# Altium PCB PCB1.PcbDoc
Units mm, origin at the board's own origin, x right, y up, seen from the top; angles counter-clockwise.
Board outline 145.29 x 144.91 mm, 2 copper layers (Top Layer, Bottom Layer); 41 components, 36 nets, 219 pads, 0 vias.
Unrouted connection lines stored in the file: 1.
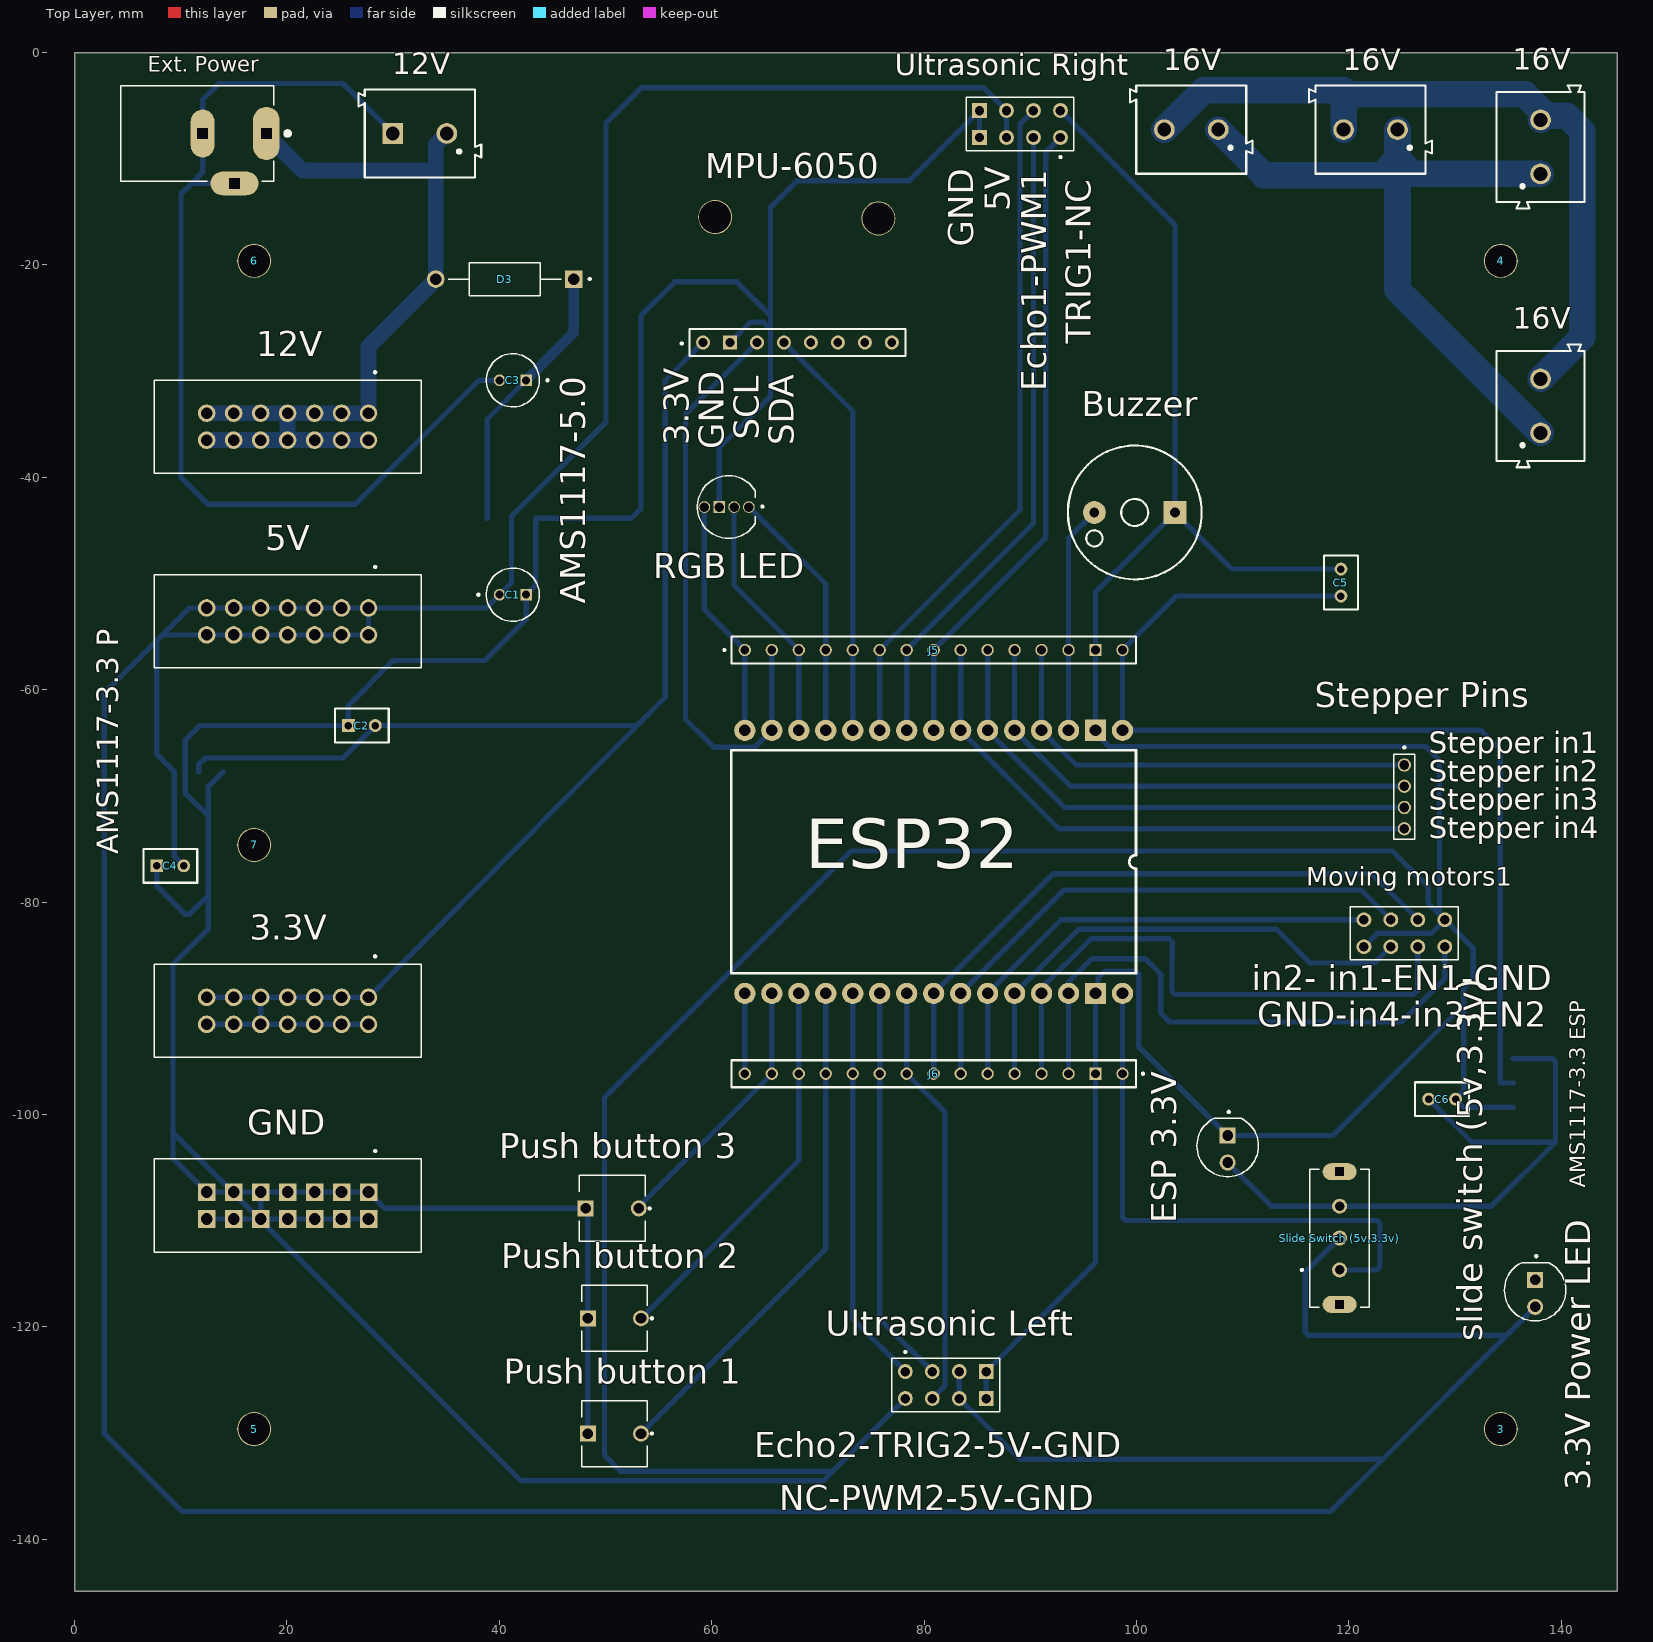
[diagram p0: Top Layer view]
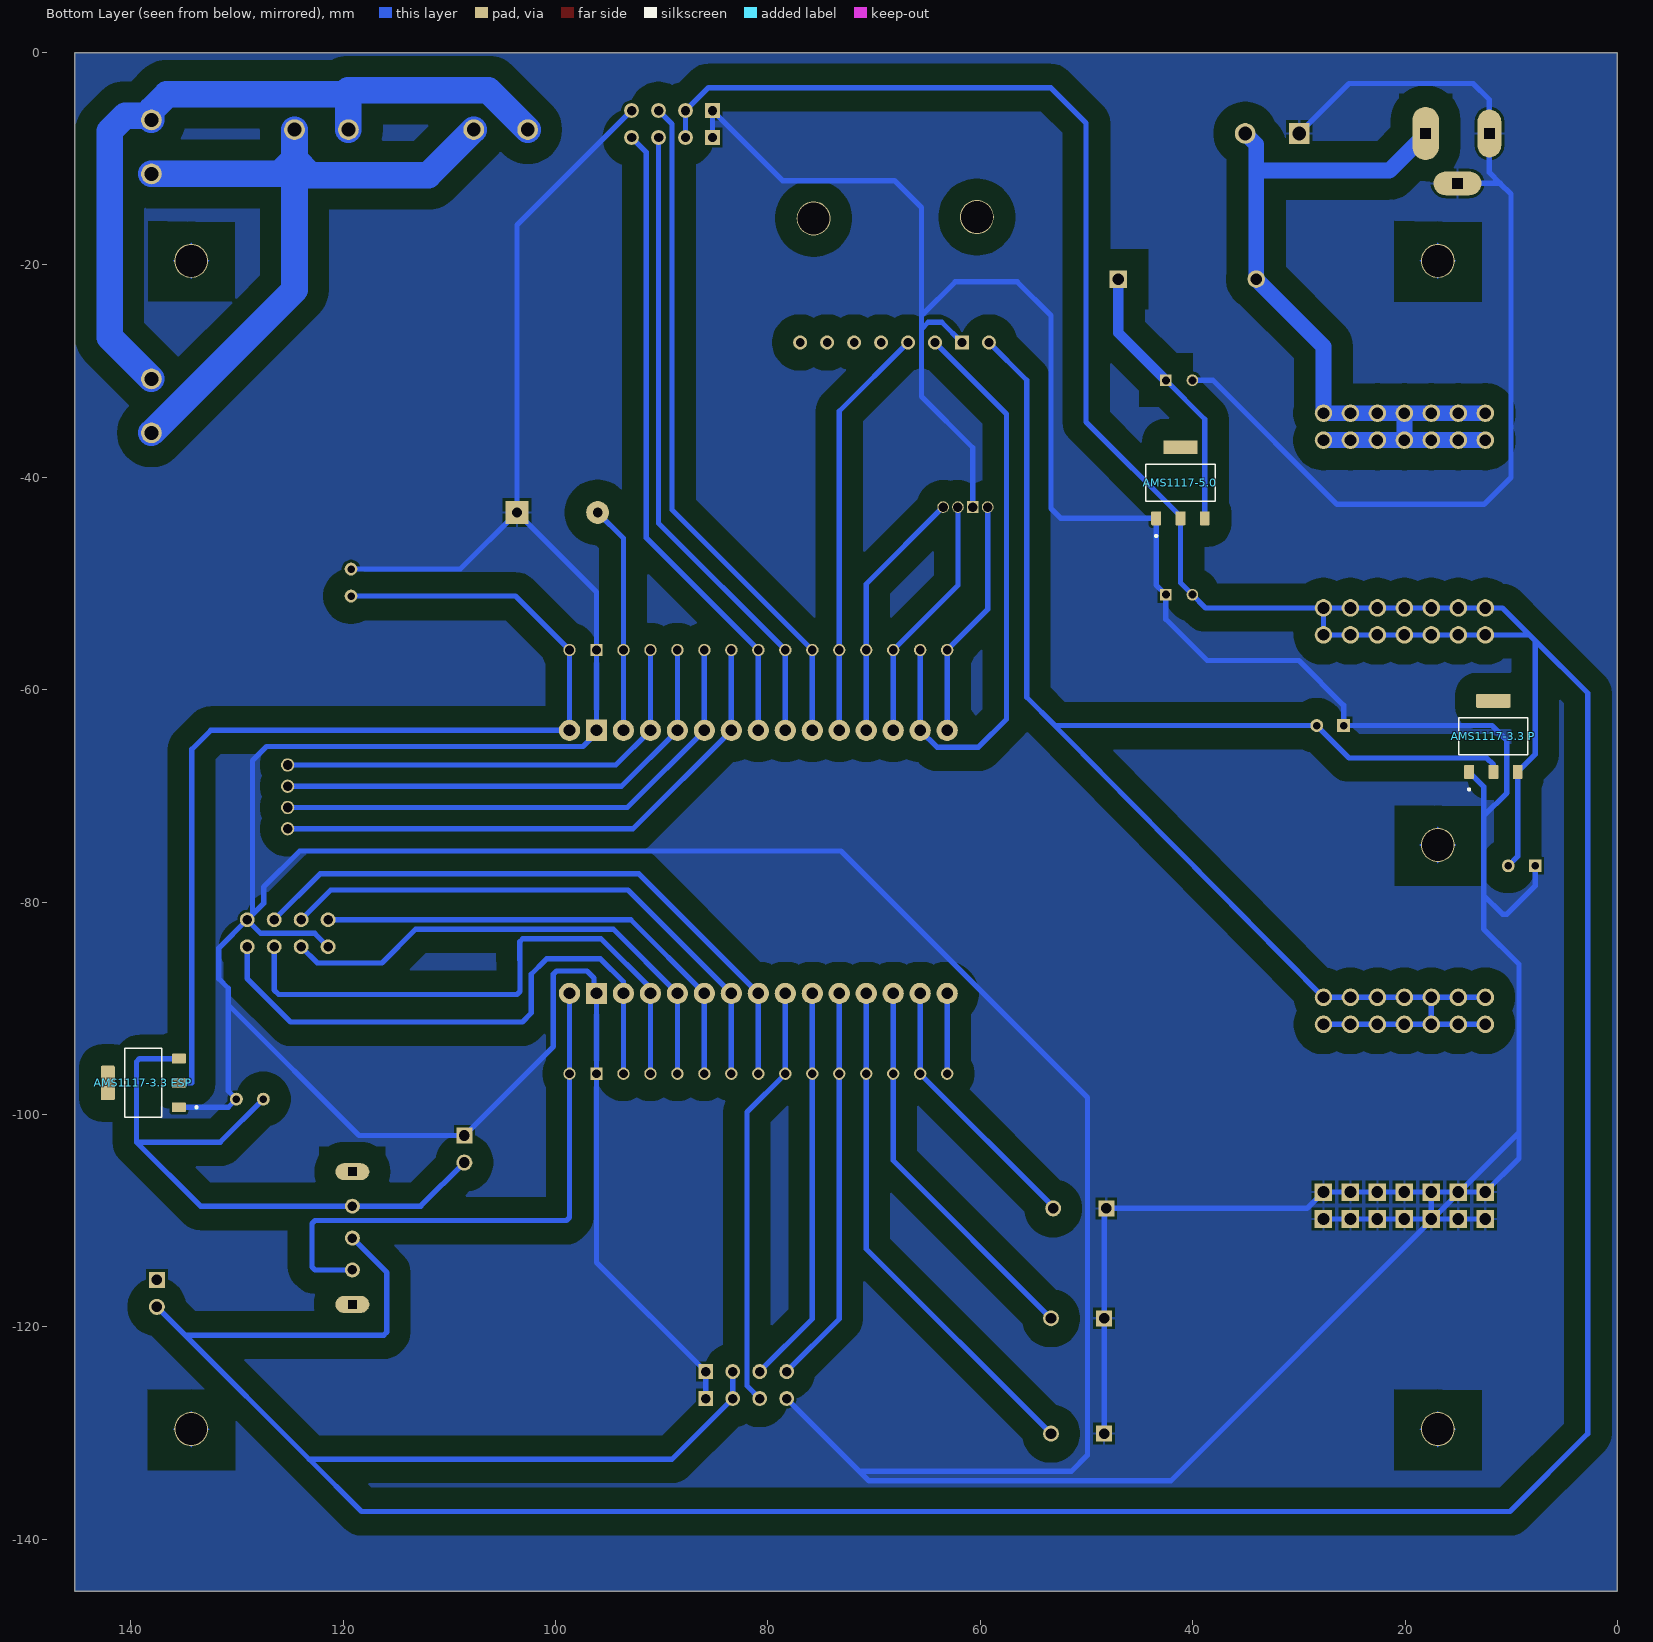
[diagram p1: Bottom Layer view, seen from below]
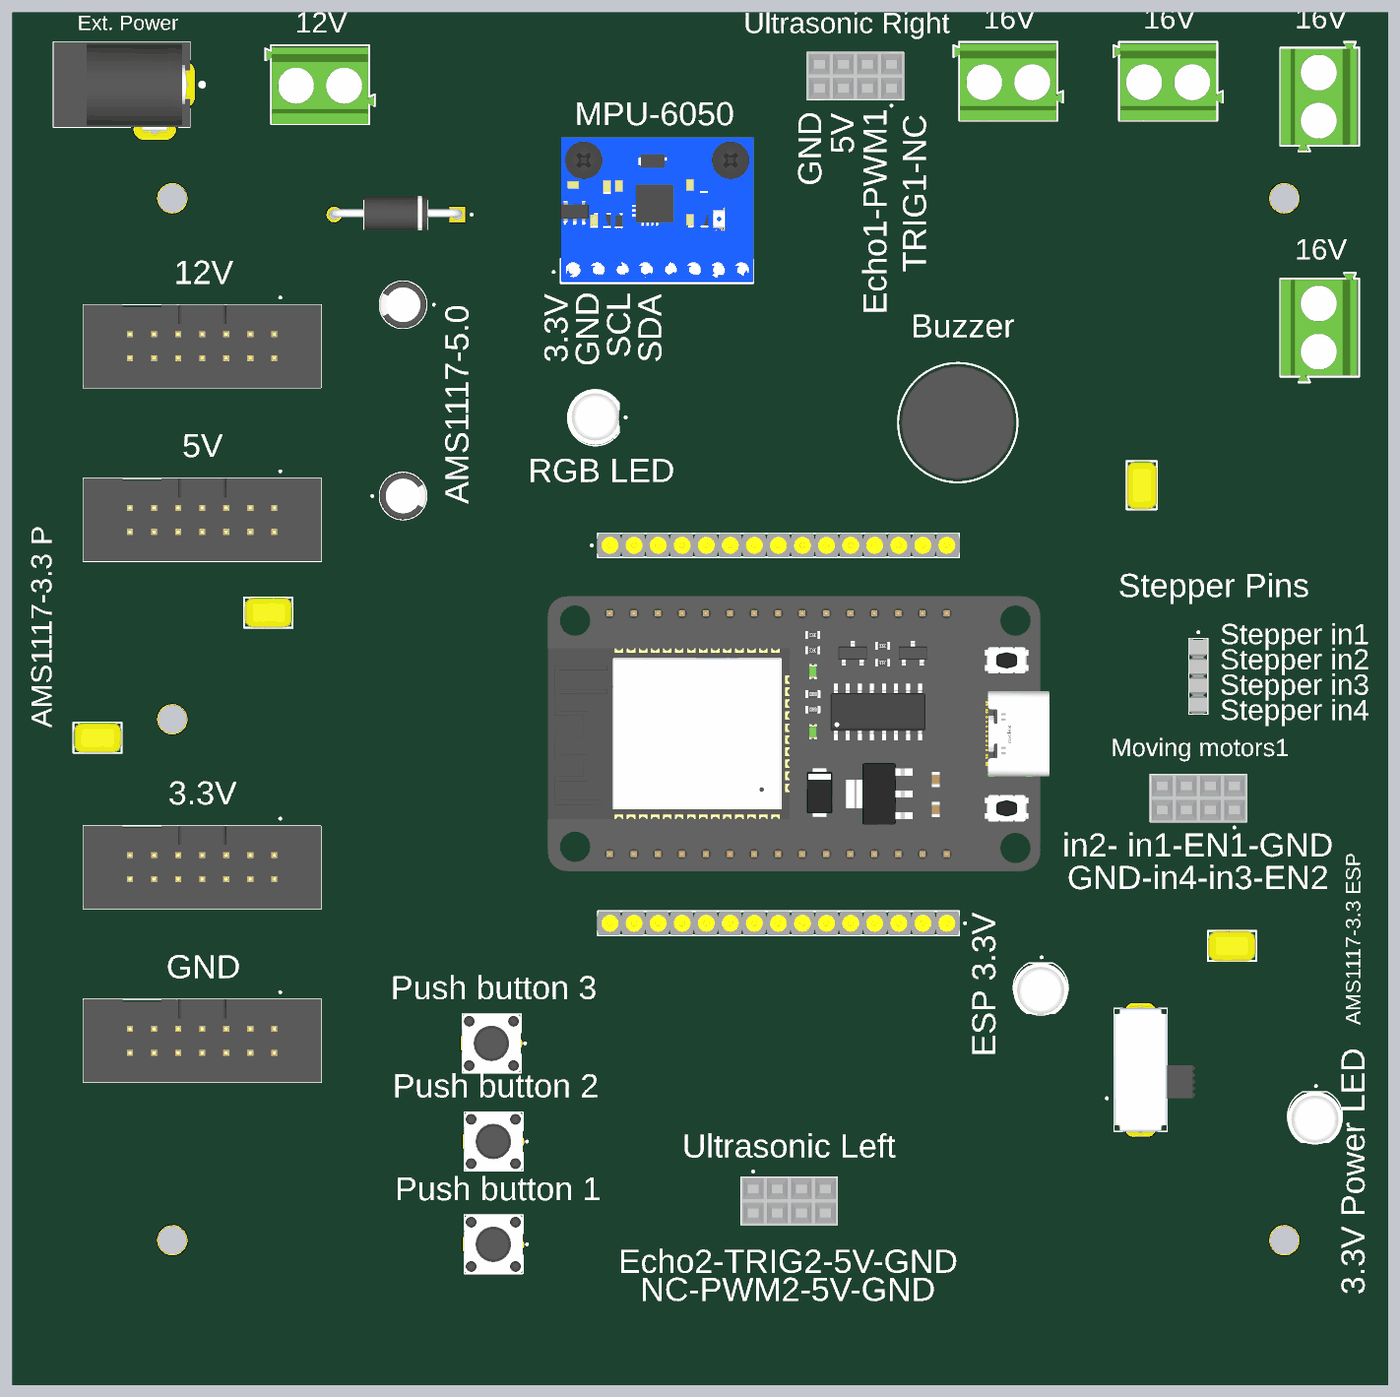
[diagram p2: 3D render of the assembled board from above, using the file's embedded part models]
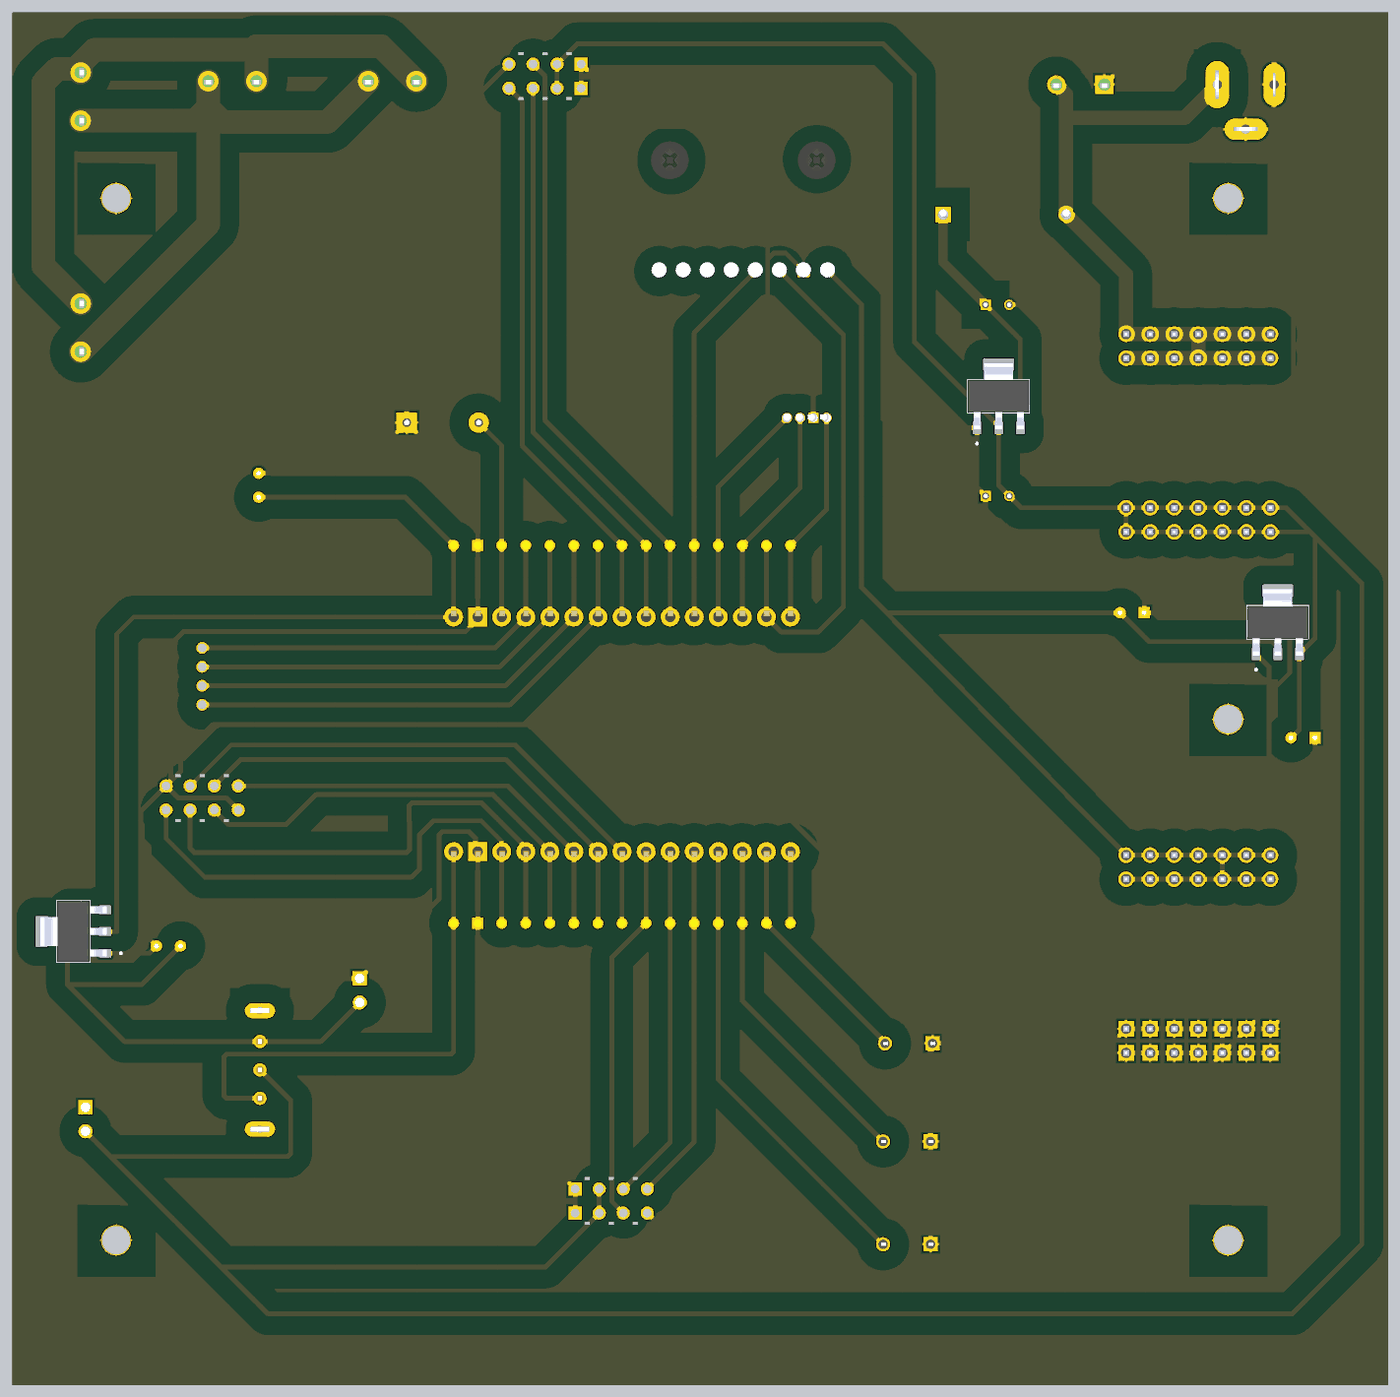
[diagram p3: 3D render of the assembled board from below, using the file's embedded part models]

## Layer stack, top to bottom
Top Solder: solder mask 0.0102, Solder Resist, Dk 3.5
Top Layer: signal copper 0.0356
Dielectric 1: dielectric 0.32, FR-4, Dk 4.8
Bottom Layer: signal copper 0.0356
Bottom Solder: solder mask 0.0102, Solder Resist, Dk 3.5

## Board outline
0,-144.907 145.288,-144.907 145.288,0 0,0

## Design rules (kind name [scope] priority, off if disabled: settings)
Clearance [All] p1: gap=0.254 ignorepadtopadclearanceinfootprint=FALSE except(0: Arc-Hole Track-Hole SMDPad-Hole THPad-Hole Via-Hole Fill-Hole Poly-Hole Region-Hole Text-Hole; 2: Arc-Poly Track-Poly SMDPad-Poly THPad-Poly)
PolygonConnect [All] p1: connectstyle=Relief reliefconductorwidth=0.254 reliefentries=4 polygonreliefangle="90 Angle" airgapwidth=0.254
RoutingLayers [All] p1: top layer_v5=FALSE bottom layer_v5=TRUE
RoutingVias [All] p1: holewidth=0.711 width=1.27 viastyle="Through Hole" minholewidth=0.711 minwidth=1.27 maxholewidth=0.711 maxwidth=1.27
SolderMaskExpansion [All] p1: expansion=0.102 istentingtop=FALSE
Width [All] p1: maxlimit=2.5 minlimit=0.254 preferedwidth=0.5
29 further rules are at their usual default settings.

## Components (designator, comment, footprint, x,y, rotation, side; value= is the part's Value field where it differs from the comment)
3 "Mounting Hole" PCBComponent_1 134.304,-129.619 r90 top
3.3V "3.3v pin headers block" AMPHENOL_52601-S14-4LF#1 20.066,-90.235 r180 top
"3.3V Power LED" "LED 5mm" "LED 5mm" 137.541,-116.84 r270 top
4 "Mounting Hole" PCBComponent_1 134.304,-19.619 r90 top
5 "Mounting Hole" PCBComponent_1 16.916,-129.619 r90 top
5V "5v pin headers block" AMPHENOL_52601-S14-4LF#1 20.066,-53.568 r180 top
6 "Mounting Hole" PCBComponent_1 16.916,-19.619 r90 top
7 "Mounting Hole" PCBComponent_1 16.916,-74.619 r90 top
12V "12v pin headers block" AMPHENOL_52601-S14-4LF#1 20.066,-35.235 r180 top
12V "From Buck" 691213510002#1 32.512,-7.62 r180 top
16V "From Buck" 691213510002#2 138.049,-8.89 r90 top
16V "From Buck" 691213510002#2 138.049,-33.274 r90 top
16V "From Buck" 691213510002#2 122.036,-7.26 r180 top
16V "From Buck" 691213510002#2 105.156,-7.26 r180 top
"AMS1117-3.3 ESP" "AMS1117-3.3" SOT229P700X180-4N 138.811,-97.028 r0 bottom
"AMS1117-3.3 P" "AMS1117-3.3" SOT229P700X180-4N 11.684,-64.389 r90 bottom
AMS1117-5.0 "AMS1117-5.0" SOT229P700X180-4N 41.148,-40.513 r90 bottom
Buzzer "Buzzer" "Buzzer 5V" 99.832,-43.307 r180 top
C1 "CAP  33UF 50V RADIAL" "CAP  33UF 50V RADIAL"#1 41.275,-51.054 r0 top
C2 "Ceramic Capacitor 100nF" C320C#1 34.051,-56.373 r0 top
C3 "CAP  33UF 50V RADIAL" "CAP  33UF 50V RADIAL"#2 41.275,-30.861 r180 top
C4 "Ceramic Capacitor 100nF" C320C#1 16.017,-69.581 r0 top
C5 "Ceramic Capacitor 100nF" C320C#2 126.253,-56.911 r270 top
C6 "Ceramic Capacitor 100nF" C320C#2 121.778,-105.552 r180 top
D3 "RL207" DIOAD1300W80L670D310 40.513,-21.336 r180 top
ESP32 "ESP32DEVKITV1" ESP32DEVKITV1 81.026,-75.508 r90 top
"ESP 3.3V" "LED 5mm" "LED 5mm" 108.585,-103.251 r270 top
"Ext. Power" "DC Power Jack Female Socket" "DC Power Jack Female Socket" 18.065,-7.62 r180 top
GND "GND pin headers block" AMPHENOL_52601-S14-4LF#2 20.066,-108.568 r180 top
J5 "TS-115-T-A-1" SAMTEC_TS-115-T-A-1#1 80.899,-56.261 r0 top
J6 "TS-115-T-A-1" SAMTEC_TS-115-T-A-1#2 80.899,-96.157 r180 top
"Moving motors1" "Pin header female block 8 pin" "Pin header female block 8 pin"#1 125.222,-82.931 r180 top
MPU-6050 "MPU-6050" MPU-6050 57.658,-28.829 r90 top
"Push button 1" "FSM8JRT" TE_FSM8JRT 53.34,-130.048 r180 top
"Push button 2" "FSM8JRT" TE_FSM8JRT 53.34,-119.189 r180 top
"Push button 3" "FSM8JRT" TE_FSM8JRT 53.137,-108.839 r180 top
"RGB LED" "common cathode" "LED RGB 5mm" 61.595,-42.799 r180 top
"Slide Switch (5v,3.3v)" "slide switch (5v,3.3v)" "Slide switch" 119.126,-111.633 r90 top
"Stepper Pins" "Pin hreader 4 pins" "Pin hreader 4 pins" 125.222,-67.088 r270 top
"Ultrasonic Left" "Pin header female block 8 pin" "Pin header female block 8 pin"#2 82.042,-125.476 r0 top
"Ultrasonic Right" "Pin header female block 8 pin" "Pin header female block 8 pin"#2 89.027,-6.731 r180 top

## Footprints (in the part's own frame and the unit in brackets; to place one, negate y for a bottom-side part, rotate by r counter-clockwise, add the part's x,y. Pads: shape width x height; smd on the part's side, far side on the other; paste and mask are expansions set on the pad)
691213510002#1 [mm]
  round 1.95 hole 1.3: 1(-2.54,0)
  rect 1.95x1.95 hole 1.3: 2(2.54,0)
  silkscreen extent -5.78,-4.15 5.78,4.15, body extent -5.68,-3.94 5.68,4.16, height 10
691213510002#2 [mm]
  round 1.95 hole 1.3: 1(-2.54,0) 2(2.54,0)
  silkscreen extent -5.78,-4.15 5.78,4.15, body extent -5.68,-3.94 5.68,4.16, height 10
AMPHENOL_52601-S14-4LF#1 [mm]
  round 1.65 hole 1.1: 1(-7.62,-1.27) 2(-7.62,1.27) 3(-5.08,-1.27) 4(-5.08,1.27) 5(-2.54,-1.27) 6(-2.54,1.27) 7(0,-1.27) 8(0,1.27) 9(2.54,-1.27) 10(2.54,1.27) 11(5.08,-1.27) 12(5.08,1.27) 13(7.62,-1.27) 14(7.62,1.27)
  silkscreen extent -12.57,-5.23 12.57,4.38, body extent -12.57,-4.38 12.57,4.38, height 9.53
AMPHENOL_52601-S14-4LF#2 [mm]
  rect 1.65x1.65 hole 1.1: 1(-7.62,-1.27) 2(-7.62,1.27) 3(-5.08,-1.27) 4(-5.08,1.27) 5(-2.54,-1.27) 6(-2.54,1.27) 7(0,-1.27) 8(0,1.27) 9(2.54,-1.27) 10(2.54,1.27) 11(5.08,-1.27) 12(5.08,1.27) 13(7.62,-1.27) 14(7.62,1.27)
  silkscreen extent -12.57,-5.23 12.57,4.38, body extent -12.57,-4.38 12.57,4.38, height 9.53
"Buzzer 5V" [mil]
  rect 85x85 hole 36: NEG(-149.61,0)
  round 85 hole 36: POS(149.61,0)
  silkscreen extent -248,-248 248,248, body extent -236,-236 236,236, height 394
C320C#1 [mm]
  rect 1.21x1.21 hole 0.71: 1(-8.27,-7)
  round 1.21 hole 0.71: 2(-5.73,-7)
  silkscreen extent -9.54,-8.59 -4.46,-5.41, body extent -9.53,-8.57 -4.45,-5.4, height 7.1
C320C#2 [mm]
  round 1.21 hole 0.71: 1(-8.27,-7) 2(-5.73,-7)
  silkscreen extent -9.54,-8.59 -4.46,-5.41, body extent -9.52,-8.57 -4.45,-5.4, height 7.1
"CAP  33UF 50V RADIAL"#1 [mm]
  rect 1.1x1.1 hole 0.75: N(1.25,0)
  round 1.1 hole 0.75: P(-1.25,0)
  silkscreen extent -3.35,-2.5 2.5,2.5, body extent -2.49,-2.5 2.5,2.5, height 11
"CAP  33UF 50V RADIAL"#2 [mm]
  round 1.1 hole 0.75: N(1.25,0)
  rect 1.1x1.1 hole 0.75: P(-1.25,0)
  silkscreen extent -3.35,-2.5 2.5,2.5, body extent -2.49,-2.5 2.5,2.5, height 11
"DC Power Jack Female Socket" [mm]
  oval 2.5x5 hole 1 square: 1(0,0)
  oval 2.25x4.5 hole 1 square: 2(6,0)
  oval 4.5x2.25 hole 1 square: 3(3,4.7)
  silkscreen extent -2.2,-4.5 13.7,4.5, body extent -0.7,-4.5 13.7,4.9, height 11
DIOAD1300W80L670D310 [mm]
  round 1.65 hole 1.1: A(6.5,0)
  rect 1.65x1.65 hole 1.1: C(-6.5,0)
  silkscreen extent -8.1,-1.55 5.32,1.55, body extent -6.9,-1.95 6.9,1.65, height 3.6
ESP32DEVKITV1 [mm]
  round 2 hole 1.1: 1(11.684,-17.653) 3(11.684,-12.573) 4(11.684,-10.033) 5(11.684,-7.493) 6(11.684,-4.953) 7(11.684,-2.413) 8(11.684,0.127) 9(11.684,2.667) 10(11.684,5.207) 11(11.684,7.747) 12(11.684,10.287) 13(11.684,12.827) 14(11.684,15.367) 15(11.684,17.907) 16(-13.086,17.907) 17(-13.086,15.367) 18(-13.086,12.827) 19(-13.086,10.287) 20(-13.086,7.747) 21(-13.086,5.207) 22(-13.086,2.667) 23(-13.086,0.127) 24(-13.086,-2.413) 25(-13.086,-4.953) 26(-13.086,-7.493) 27(-13.086,-10.033) 28(-13.086,-12.573) 30(-13.086,-17.653)
  rect 2x2 hole 1.1: 2(11.684,-15.113) 29(-13.086,-15.113)
  silkscreen extent -11.2,-18.92 9.79,19.18, body extent -15.13,-28.49 13.86,24.48, height 8.36
"LED 5mm" [mm]
  round 1.508 hole 1: A(1.27,0)
  rect 1.508x1.508 hole 1: C(-1.27,0)
  silkscreen extent -3.6,-2.9 2.6,2.9, body extent -2.88,-2.9 2.51,2.9, height 12.1
"LED RGB 5mm" [mm]
  round 1.1 hole 0.9: 1(-1.905,0) 2(-0.508,0) 4(2.286,0)
  rect 1.1x1.1 hole 0.9: 3(0.889,0)
  silkscreen extent -3.27,-2.95 2.95,2.95, body extent -2.47,-3.05 2.98,2.84, height 9.6
MPU-6050 [mil]
  round 52 hole 32: 01(60,-60) 03(60,-260) 04(60,-360) 05(60,-460) 06(60,-560) 07(60,-660) 08(60,-760)
  rect 52x52 hole 32: 02(60,-160)
  round 125.98 hole 118.11: ""(520,-710) ""(525,-105)
  silkscreen extent 10,-810 110,23, body extent 15,-811 615,-9, height 612
PCBComponent_1 [mm]
  round 3.2 hole 3: ""(0,0)
  Bottom Layer lines w0.15: 0,1.649 0,-1.651 ; -1.651,0 1.649,0
"Pin header female block 8 pin"#1 [mm]
  round 1.398 hole 0.89: 1(-3.81,1.27) 2(-1.27,1.27) 3(1.27,1.27) 4(3.81,1.27) 5(-3.81,-1.27) 6(-1.27,-1.27) 7(1.27,-1.27) 8(3.81,-1.27)
  silkscreen extent -5.08,-2.52 5.08,3.21, body extent -5.08,-2.51 5.08,2.51, height 6.22
"Pin header female block 8 pin"#2 [mm]
  round 1.398 hole 0.89: 1(-3.81,1.27) 2(-1.27,1.27) 3(1.27,1.27) 5(-3.81,-1.27) 6(-1.27,-1.27) 7(1.27,-1.27)
  rect 1.398x1.398 hole 0.89: 4(3.81,1.27) 8(3.81,-1.27)
  silkscreen extent -5.08,-2.52 5.08,3.21, body extent -5.08,-2.51 5.08,2.51, height 6.22
"Pin hreader 4 pins" [mm]
  round 1.25 hole 0.9: 1(0,0) 2(2,0) 3(4,0) 4(6,0)
  silkscreen extent -1.75,-1 7,1, body extent -1.01,-1.02 6.98,0.98, height 5.78
SAMTEC_TS-115-T-A-1#1 [mil]
  round 45.78 hole 32: 01(-700,0) 02(-600,0) 03(-500,0) 04(-400,0) 05(-300,0) 06(-200,0) 07(-100,0) 08(0,0) 09(100,0) 10(200,0) 11(300,0) 12(400,0) 13(500,0) 15(700,0)
  rect 45.78x45.78 hole 32: 14(600,0)
  silkscreen extent -780,-50 750,50, body extent -754,-50 754,50, height 326
SAMTEC_TS-115-T-A-1#2 [mil]
  round 45.78 hole 32: 01(-700,0) 03(-500,0) 04(-400,0) 05(-300,0) 06(-200,0) 07(-100,0) 08(0,0) 09(100,0) 10(200,0) 11(300,0) 12(400,0) 13(500,0) 14(600,0) 15(700,0)
  rect 45.78x45.78 hole 32: 02(-600,0)
  silkscreen extent -780,-50 750,50, body extent -754,-50 754,50, height 326
"Slide switch" [mm]
  round 1.408 hole 0.9: 1(-3,0) 2(0,0) 3(3,0)
  oval 1.6x3.2 hole 0.8 square: SH1(-6.25,0) SH2(6.25,0)
  silkscreen extent -6.5,-2.8 6.5,3.66, body extent -6.5,-5.8 6.5,2.8, height 6
SOT229P700X180-4N [mm]
  rrect15% 1.31x0.93 smd: 1(-3.345,2.29) 2(-3.345,0) 3(-3.345,-2.29)
  rrect15% 1.31x3.24 smd: 4(3.345,0)
  silkscreen extent -5.1,-3.25 1.75,3.25, body extent -3.5,-3.25 3.5,3.25, height 1.8
TE_FSM8JRT [mil]
  round 59 hole 39: 1(0,0)
  rect 59x59 hole 39: 2(197,0)
  silkscreen extent -44,-122 221,122, body extent -22,-122 222,122, height 372

## Part data
3.3V 5V 12V GND: library part 52601-S14-4LF, Package=None, Availability=Unavailable, MF="{'manufacturer': u'Amphenol ICC (FCI)'}", MP=52601-S14-4LF, Price=None
"3.3V Power LED" "ESP 3.3V": "Red 623nm LED Indication - Discrete 1.9V Radial", Package=None, Availability=Unavailable, MF="{'manufacturer': u'Wurth Elektronik'}", MP=151054RS03000, Price=None
12V 16V 16V 16V 16V: library part "Terminal Block", "2 Position Wire to Board Terminal Block Horizontal with Board 0.200 (5.08mm) Through Hole", Package=None, Check_prices=https://www.snapeda.com/parts/691213510002/Wurth+Electronics/view-part/?ref=eda, MF="Wurth Electronics", MP=691213510002, SnapEDA_Link=https://www.snapeda.com/parts/691213510002/Wurth+Electronics/view-part/?ref=snap
"AMS1117-3.3 ESP" "AMS1117-3.3 P" AMS1117-5.0 J5 J6 "Moving motors1" "Stepper Pins" "Ultrasonic Left" "Ultrasonic Right": Package=None, Availability=Unavailable, Price=None
  "AMS1117-3.3 ESP" "AMS1117-3.3 P": MF="{'manufacturer': u'Advanced Monolithic Systems'}", MP=AMS1117-3.3
  AMS1117-5.0: MF="{'manufacturer': u'Advanced Monolithic Systems'}", MP=AMS1117-5.0
  J5 J6: MF="{'manufacturer': u'Samtec'}", MP=TS-115-T-A-1
  "Moving motors1" "Ultrasonic Left" "Ultrasonic Right": MF="{'manufacturer': u'TE Connectivity'}", MP=5-534998-4
  "Stepper Pins": MF="{'manufacturer': u'TE Connectivity'}", MP=2355181-4
Buzzer: library part "Buzzer 5V", "BUZZER 2.3KHZ 4-6VDC", Package=None, Availability=Unavailable, MF="{'manufacturer': u'Soberton Inc.'}", MP=WST-1205S, Price=None
C1 C3: "NHG-A", Package=None, Availability=Unavailable, MF="{'manufacturer': u'Panasonic'}", MP=ECA1HHG330I, Price=None
C2 C4 C5 C6: "0.1ÂµF Â±20% 50V Ceramic Capacitor Z5U Radial", Package="Radial KEMET", Availability=Unavailable, MF=KEMET, MP=C320C104M5U5TA, Price=None, SnapEDA_Link=https://www.snapeda.com/parts/C320C104M5U5TA/KEMET/view-part/228184/?ref=snap
D3: "Semiconductors and Actives, Power Diodes, Discretes (diodes, transistors, thyristors ...), Diodes", Package=None, Availability=Unavailable, MF="{'manufacturer': u'Diodes Inc.'}", MP=RL207, Price=None
"Ext. Power": "2.0 mm Center Pin, 2.5 A, Right Angle, Through Hole, Dc Power Jack Connector", Package=None, Availability=Unavailable, MF="{'manufacturer': u'CUI Devices'}", MP=PJ-002A, Price=None
"Push button 1" "Push button 2" "Push button 3": "Tactile Switches PUSHBUTTON SWITCH TACT", Package=None, Availability=Unavailable, MF="{'manufacturer': u'TE Connectivity'}", MP=FSM8JRT, Price=None
"RGB LED": library part "LED RGB 5mm", Package=None, Availability=Unavailable, MF="{'manufacturer': u'Kingbright'}", MP=WP154A4SUREQBFZGC, Price=None
"Slide Switch (5v,3.3v)": library part "Slide switch", Package=None, Availability=Unavailable, MF="{'manufacturer': u'E-Switch'}", MP=EG1206, Price=None

## Nets (pads, with @x,y where several pads share a name; then routed paths per layer and width w, separated by ;. In a path a pad name is that pad's centre, name@x,y a point inside that pad or via, vN(x,y) a via of type N, cw(c..) or ccw(c..) an arc to the next point about the centre after c; other vN are vias at no path point)
3.3V: 3.3V.1 3.3V.2 3.3V.3 3.3V.4 3.3V.5 3.3V.6 3.3V.7 3.3V.8 3.3V.9 3.3V.10 3.3V.11 3.3V.12 3.3V.13 3.3V.14 "AMS1117-3.3 P.2" C2.2 MPU-6050.01 | length 154.9
  Bottom Layer w0.5: 11.684,-67.734 11.684,-67.056 12.319,-66.421 25.273,-66.421 C2.2 52.959,-63.373 55.626,-60.706 ; 3.3V.14 3.3V.12 3.3V.10 ; 3.3V.13 3.3V.11 3.3V.9 ; 3.3V.2 3.3V.4 3.3V.6 3.3V.8 3.3V.10 ; MPU-6050.01 55.626,-30.861 55.626,-60.706 ; 3.3V.10 3.3V.9 ; 3.3V.9 3.3V.7 3.3V.5 3.3V.3 3.3V.1 55.626,-60.706
+5: 5V.1 5V.2 5V.3 5V.4 5V.5 5V.6 5V.7 5V.8 5V.9 5V.10 5V.11 5V.12 5V.13 5V.14 "3.3V Power LED.A" "AMS1117-3.3 P.3" "Slide Switch (5v,3.3v).2" "Ultrasonic Left.3" "Ultrasonic Left.7" "Ultrasonic Right.3" "Ultrasonic Right.7" AMS1117-5.0.2 C1.P C4.2 | length 466
  Bottom Layer w0.5: C4.2 9.394,-75.688 9.394,-67.734 7.747,-66.087 7.747,-55.372 ; 83.312,-124.206 83.312,-126.746 89.027,-132.461 123.19,-132.461 ; 87.757,-8.001 87.757,-5.461 85.598,-3.302 53.373,-3.302 50.038,-6.637 50.038,-34.778 41.148,-43.668 AMS1117-5.0.2 41.148,-49.931 C1.P 38.781,-52.298 5V.1 ; 119.126,-111.633 115.875,-114.884 115.875,-120.484 116.168,-120.777 134.874,-120.777 ; 137.541,-118.11 134.874,-120.777 ; 7.747,-55.372 8.281,-54.838 ; 7.747,-55.372 2.794,-60.325 2.794,-130.048 10.125,-137.379 118.272,-137.379 123.19,-132.461 ; 8.281,-54.838 5V.12 5V.10 5V.8 5V.6 5V.4 5V.2 5V.1 ; 8.281,-54.838 10.821,-52.298 5V.13 5V.11 5V.9 5V.7 5V.5 5V.3 5V.1 ; 123.19,-132.461 134.874,-120.777
+12: 12V.1 12V.2@27.686,-36.505 12V.3 12V.4 12V.5 12V.6 12V.7 12V.8 12V.9 12V.10 12V.11 12V.12 12V.13 12V.14 "Ext. Power.1" D3.A | length 79.9
  Bottom Layer w0.5: 18.065,-7.696 18.065,-7.62
  Bottom Layer w1.5: 12V.14 12V.12 12V.10 12V.8 ; 12V.13 12V.11 12V.9 12V.7 ; 18.065,-7.696 21.489,-11.12 33.965,-11.12 34.013,-11.072 ; 12V.2@27.686,-36.505 12V.4 12V.6 12V.8 ; 12V.1@35.052,-7.62 34.013,-8.659 34.013,-11.072 ; 12V.8 12V.7 ; 12V.7 12V.5 12V.3 27.686,-33.965 27.686,-27.663 D3.A 34.013,-11.072
GND: 12V.2@29.972,-7.62 "3.3V Power LED.C" "AMS1117-3.3 ESP.1" "AMS1117-3.3 P.1" "ESP 3.3V.C" "Ext. Power.2" "Ext. Power.3" "Moving motors1.4" "Moving motors1.5" "Push button 1.2" "Push button 2.2" "Push button 3.2" "RGB LED.3" "Ultrasonic Left.4" "Ultrasonic Left.5" "Ultrasonic Left.8" "Ultrasonic Right.4" "Ultrasonic Right.5" "Ultrasonic Right.8" AMS1117-5.0.1 Buzzer.NEG C1.N C2.1 C3.N C4.1 C5.1 C6.1 ESP32.2 ESP32.29 GND.1 GND.2 GND.3 GND.4 GND.5 GND.6 GND.7 GND.8 GND.9 GND.10 GND.11 GND.12 GND.13 GND.14 J5.14 J6.02 MPU-6050.02 | length 876.9
  Bottom Layer w0.5: C4.1 7.747,-78.486 10.397,-81.136 10.812,-81.136 12.598,-79.35 ; 9.271,-101.702 GND.11@14.868,-107.298 ; GND.14 GND.12 GND.10@17.408,-109.838 ; 13.974,-67.734 12.598,-69.11 12.598,-71.907 ; 15.065,-12.32 11.048,-12.32 ; GND.2 GND.4 GND.6 GND.8 GND.10 ; 12V.2@29.972,-7.62 25.273,-2.921 13.589,-2.921 12.065,-4.445 12.065,-7.62 12.065,-11.303 11.048,-12.32 ; C3.N 38.1,-30.861 26.416,-42.545 12.573,-42.545 10.033,-40.005 10.033,-13.335 11.048,-12.32 ; 48.336,-130.048 48.336,-119.189 48.336,-109.042 48.133,-108.839 29.227,-108.839 GND.1 GND.3 GND.5 GND.7 GND.9 ; 60.706,-42.799 60.706,-37.211 65.532,-32.385 65.532,-26.035 ; MPU-6050.02 63.627,-25.4 64.897,-25.4 65.532,-26.035 ; 78.232,-126.746 71.374,-133.604 ; 85.217,-8.001 85.217,-5.461 78.613,-12.065 68.072,-12.065 65.532,-14.605 65.532,-24.765 ; 85.852,-126.746 85.852,-124.206 96.139,-113.919 J6.02 ESP32.29 96.378,-88.355 96.378,-87.137 97.028,-86.487 99.91,-86.487 100.203,-86.78 100.203,-93.599 108.585,-101.981 118.491,-101.981 130.81,-89.662 ; 92.837,-5.461 103.632,-16.256 Buzzer.NEG ; C5.1 108.966,-48.641 Buzzer.NEG ; 121.412,-84.201 122.682,-82.931 127.762,-82.931 129.032,-81.661 ; 135.466,-99.318 130.814,-99.318 C6.1 130.81,-97.79 130.81,-89.662 ; 12.598,-79.35 12.598,-82.529 9.276,-85.851 9.276,-101.702 9.276,-104.128 GND.13 GND.11@14.868,-107.298 ; 12.598,-79.35 12.598,-71.907 ; 12.598,-71.907 10.414,-69.723 10.414,-64.77 11.811,-63.373 C2.1 25.781,-61.468 29.995,-57.254 38.631,-57.254 42.525,-53.36 C1.N 43.438,-50.141 AMS1117-5.0.1 52.408,-43.858 53.34,-42.926 53.34,-24.765 56.515,-21.59 62.357,-21.59 65.532,-24.765 ; GND.11@14.868,-107.298 GND.11 GND.9 ; GND.11@14.868,-107.298 GND.10@17.408,-109.838 ; GND.10@17.408,-109.838 42.062,-134.493 70.485,-134.493 71.374,-133.604 ; GND.10@17.408,-109.838 GND.10 ; GND.10 GND.9 ; 65.532,-26.035 65.532,-24.765 ; 71.374,-133.604 51.435,-133.604 49.911,-132.08 49.911,-98.4 73.127,-75.184 124.079,-75.184 127.483,-78.588 127.483,-80.112 128.524,-81.153 ; Buzzer.NEG 96.139,-50.8 J5.14 ESP32.2 96.139,-64.084 97.409,-65.354 127.203,-65.354 128.524,-66.675 128.524,-81.153 ; 128.524,-81.153 129.032,-81.661 ; 129.032,-81.661 131.699,-84.328 131.699,-87.217 130.81,-88.106 130.81,-89.662
Net16V_1: 16V.1 | length 67.5
  Bottom Layer w2.5: 16V.1@107.696,-7.26 111.993,-11.557 123.063,-11.557 124.576,-10.044 124.576,-22.341 16V.1@138.049,-35.814 ; 16V.1@124.576,-7.26 124.576,-10.022 125.984,-11.43 16V.1@138.049,-11.43
Net16V_2: 16V.2 | length 71.9
  Bottom Layer w2.5: 16V.2@102.616,-7.26 106.32,-3.556 119.496,-3.556 16V.2@119.496,-7.26 ; 119.496,-3.937 136.585,-3.937 138.049,-5.401 138.049,-6.35 138.45,-5.949 140.522,-5.949 141.986,-7.413 141.986,-26.797 16V.2@138.049,-30.734
"NetAMS1117-3.3 ESP_2": "AMS1117-3.3 ESP.2" C5.2 ESP32.1 J5.15 | length 99.2
  Bottom Layer w0.5: C5.2 103.759,-51.181 J5.15 ESP32.1 132.461,-63.824 134.239,-65.602 134.239,-97.028 135.466,-97.028
"NetAMS1117-3.3 ESP_3": "AMS1117-3.3 ESP.3" "ESP 3.3V.A" "Slide Switch (5v,3.3v).3" C6.2 | length 60.4
  Bottom Layer w0.5: 108.585,-104.521 112.697,-108.633 119.126,-108.633 133.429,-108.633 139.446,-102.616 ; C6.2 131.572,-102.616 139.446,-102.616 ; 135.466,-94.738 139.153,-94.738 139.446,-95.031 139.446,-102.616
NetAMS1117-5.0_3: AMS1117-5.0.3 C3.P D3.C | length 25.9
  Bottom Layer w0.5: AMS1117-5.0.3 38.858,-34.528 C3.P
  Bottom Layer w1: C3.P 47.013,-26.373 D3.C
NetBuzzer_POS: Buzzer.POS ESP32.3 J5.13 | length 21.5
  Bottom Layer w0.5: ESP32.3 J5.13 93.599,-45.74 Buzzer.POS
NetESP32_4: "Stepper Pins.1" ESP32.4 J5.12 | length 43.1
  Bottom Layer w0.5: J5.12 ESP32.4 94.323,-67.088 125.222,-67.088
NetESP32_5: "Stepper Pins.2" ESP32.5 J5.11 | length 46.4
  Bottom Layer w0.5: J5.11 ESP32.5 93.783,-69.088 125.222,-69.088
NetESP32_6: "Stepper Pins.3" ESP32.6 J5.10 | length 49.8
  Bottom Layer w0.5: J5.10 ESP32.6 93.243,-71.088 125.222,-71.088
NetESP32_7: "Stepper Pins.4" ESP32.7 J5.09 | length 53.2
  Bottom Layer w0.5: J5.09 ESP32.7 92.703,-73.088 125.222,-73.088
NetESP32_8: "Ultrasonic Right.1" ESP32.8 J5.08 | length 60.8
  Bottom Layer w0.5: ESP32.8 J5.08 91.44,-45.72 91.44,-9.398 92.837,-8.001
NetESP32_9: "Ultrasonic Right.2" ESP32.9 J5.07 | length 60.8
  Bottom Layer w0.5: ESP32.9 J5.07 90.297,-44.323 90.297,-8.001
NetESP32_10: "Ultrasonic Right.6" ESP32.10 J5.06 | length 64.4
  Bottom Layer w0.5: ESP32.10 J5.06 89.027,-43.053 89.027,-6.731 90.297,-5.461
NetESP32_11: ESP32.11 J5.05 MPU-6050.04 | length 39.2
  Bottom Layer w0.5: MPU-6050.04 73.279,-33.782 J5.05 ESP32.11
NetESP32_12: "RGB LED.1" ESP32.12 J5.04 | length 24
  Bottom Layer w0.5: 63.5,-42.799 70.739,-50.038 J5.04 ESP32.12
NetESP32_13: "RGB LED.2" ESP32.13 J5.03 | length 23.6
  Bottom Layer w0.5: 62.103,-42.799 62.103,-50.165 J5.03 ESP32.13
NetESP32_14: ESP32.14 J5.02 MPU-6050.03 | length 55.7
  Bottom Layer w0.5: MPU-6050.03 57.531,-34.036 57.531,-62.777 60.159,-65.405 64.078,-65.405 ESP32.14 J5.02
NetESP32_15: "RGB LED.4" ESP32.15 J5.01 | length 22.6
  Bottom Layer w0.5: 59.309,-42.799 59.309,-52.451 J5.01 ESP32.15
NetESP32_16: ESP32.16 J6.15 | length 7.6
  Bottom Layer w0.5: J6.15 ESP32.16
NetESP32_17: "Push button 3.1" ESP32.17 J6.14 | length 25.4
  Bottom Layer w0.5: 53.137,-108.839 53.137,-108.679 J6.14 ESP32.17
NetESP32_18: "Push button 2.1" ESP32.18 J6.13 | length 36.8
  Bottom Layer w0.5: 53.34,-119.189 68.199,-104.33 J6.13 ESP32.18
NetESP32_19: "Push button 1.1" ESP32.19 J6.12 | length 48.7
  Bottom Layer w0.5: 53.34,-130.048 70.739,-112.649 J6.12 ESP32.19
NetESP32_20: "Ultrasonic Left.1" ESP32.20 J6.11 | length 37.7
  Bottom Layer w0.5: ESP32.20 J6.11 73.279,-119.253 78.232,-124.206
NetESP32_21: "Ultrasonic Left.2" ESP32.21 J6.10 | length 37.7
  Bottom Layer w0.5: ESP32.21 J6.10 75.819,-119.253 80.772,-124.206
NetESP32_22: "Ultrasonic Left.6" ESP32.22 J6.09 | length 40.1
  Bottom Layer w0.5: ESP32.22 J6.09 81.975,-99.773 81.975,-125.543 80.772,-126.746
NetESP32_23: "Moving motors1.6" ESP32.23 J6.08 | length 59.6
  Bottom Layer w0.5: J6.08 ESP32.23 92.15,-77.343 122.174,-77.343 126.492,-81.661
NetESP32_24: "Moving motors1.7" ESP32.24 J6.07 | length 53.3
  Bottom Layer w0.5: J6.07 ESP32.24 93.166,-78.867 121.158,-78.867 123.952,-81.661
NetESP32_25: "Moving motors1.8" ESP32.25 J6.06 | length 45.9
  Bottom Layer w0.5: J6.06 ESP32.25 92.912,-81.661 121.412,-81.661
NetESP32_26: "Moving motors1.3" ESP32.26 J6.05 | length 47.4
  Bottom Layer w0.5: J6.05 ESP32.26 94.563,-82.55 113.157,-82.55 116.332,-85.725 122.428,-85.725 123.952,-84.201
NetESP32_27: "Moving motors1.2" ESP32.27 J6.04 | length 54.6
  Bottom Layer w0.5: J6.04 ESP32.27 91.059,-88.102 95.71,-83.451 103.085,-83.451 103.378,-83.744 103.378,-85.432 103.339,-85.471 103.339,-88.402 103.632,-88.695 126.062,-88.695 126.492,-88.265 126.492,-84.201
NetESP32_28: "Moving motors1.1" ESP32.28 J6.03 | length 54.3
  Bottom Layer w0.5: J6.03 ESP32.28 93.599,-87.503 95.758,-85.344 100.838,-85.344 100.984,-85.49 102.286,-86.792 102.286,-90.449 103.124,-91.288 124.943,-91.288 129.032,-87.198 129.032,-84.201
NetESP32_30: "Slide Switch (5v,3.3v).1" ESP32.30 J6.01 | length 53.6
  Bottom Layer w0.5: ESP32.30 J6.01 98.679,-109.689 98.972,-109.982 122.643,-109.982 122.936,-110.275 122.936,-114.34 122.643,-114.633 119.126,-114.633
pads on no net: 3. 4. 5. 6. 7. "AMS1117-3.3 ESP.4" "AMS1117-3.3 P.4" "Slide Switch (5v,3.3v).SH1" "Slide Switch (5v,3.3v).SH2" AMS1117-5.0.4 MPU-6050. MPU-6050.05 MPU-6050.06 MPU-6050.07 MPU-6050.08

## Polygon pours and split planes (outlines as drawn)
GND on Bottom Layer "GND_L02_P000" (solid, pour order 0): 0,-144.907 145.288,-144.907 145.288,0 0,0

## Other copper
Bottom Layer:
  pour cut-out: 130.152,-125.984 138.407,-125.857 138.407,-133.486 130.152,-133.486
  pour cut-out: 130.152,-15.984 138.407,-15.857 138.407,-23.486 130.152,-23.486
  pour cut-out: 12.763,-15.984 21.018,-15.857 21.018,-23.486 12.763,-23.486
  pour cut-out: 12.763,-125.984 21.018,-125.857 21.018,-133.486 12.763,-133.486
  pour cut-out: 12.763,-70.984 21.018,-70.857 21.018,-78.486 12.763,-78.486

## Silkscreen, mask and mechanical layers (free items; w line width, h text height)
Top Overlay:
  text "5V" at 88.85,-14.93 h4 r90
  text "GND" at 85.427,-18.299 h4 r90
  text "TRIG1-NC" at 96.47,-27.403 h4 r90
  text "Echo1-PWM1" at 92.288,-31.877 h4 r90
  text "SCL" at 65.234,-36.446 h4 r90
  text "3.3V" at 58.63,-36.957 h4 r90
  text "SDA" at 68.536,-36.973 h4 r90
  text "GND" at 61.932,-37.343 h4 r90
  text "Stepper in1" at 127.508,-66.688 h3.5
  text "Stepper in2" at 127.508,-69.355 h3.5
  text "Stepper in3" at 127.508,-72.022 h3.5
  text "Stepper in4" at 127.508,-74.689 h3.5
  text "in2- in1-EN1-GND" at 110.871,-89.11 h4
  text "GND-in4-in3-EN2" at 111.379,-92.539 h4
  text "Echo2-TRIG2-5V-GND" at 63.991,-133.052 h4
  text "NC-PWM2-5V-GND" at 66.376,-138.049 h4